# Altium PCB DRIVER.PcbDoc (part 3 of 5)
Units mm, origin at the board's own origin, x right, y up, seen from the top; angles counter-clockwise.
Board outline 130 x 51 mm, 4 copper layers (SIG, GND_SIG, PWR, GND_PWR), stack 1.544 mm thick; 199 components, 147 nets, 682 pads, 359 vias.
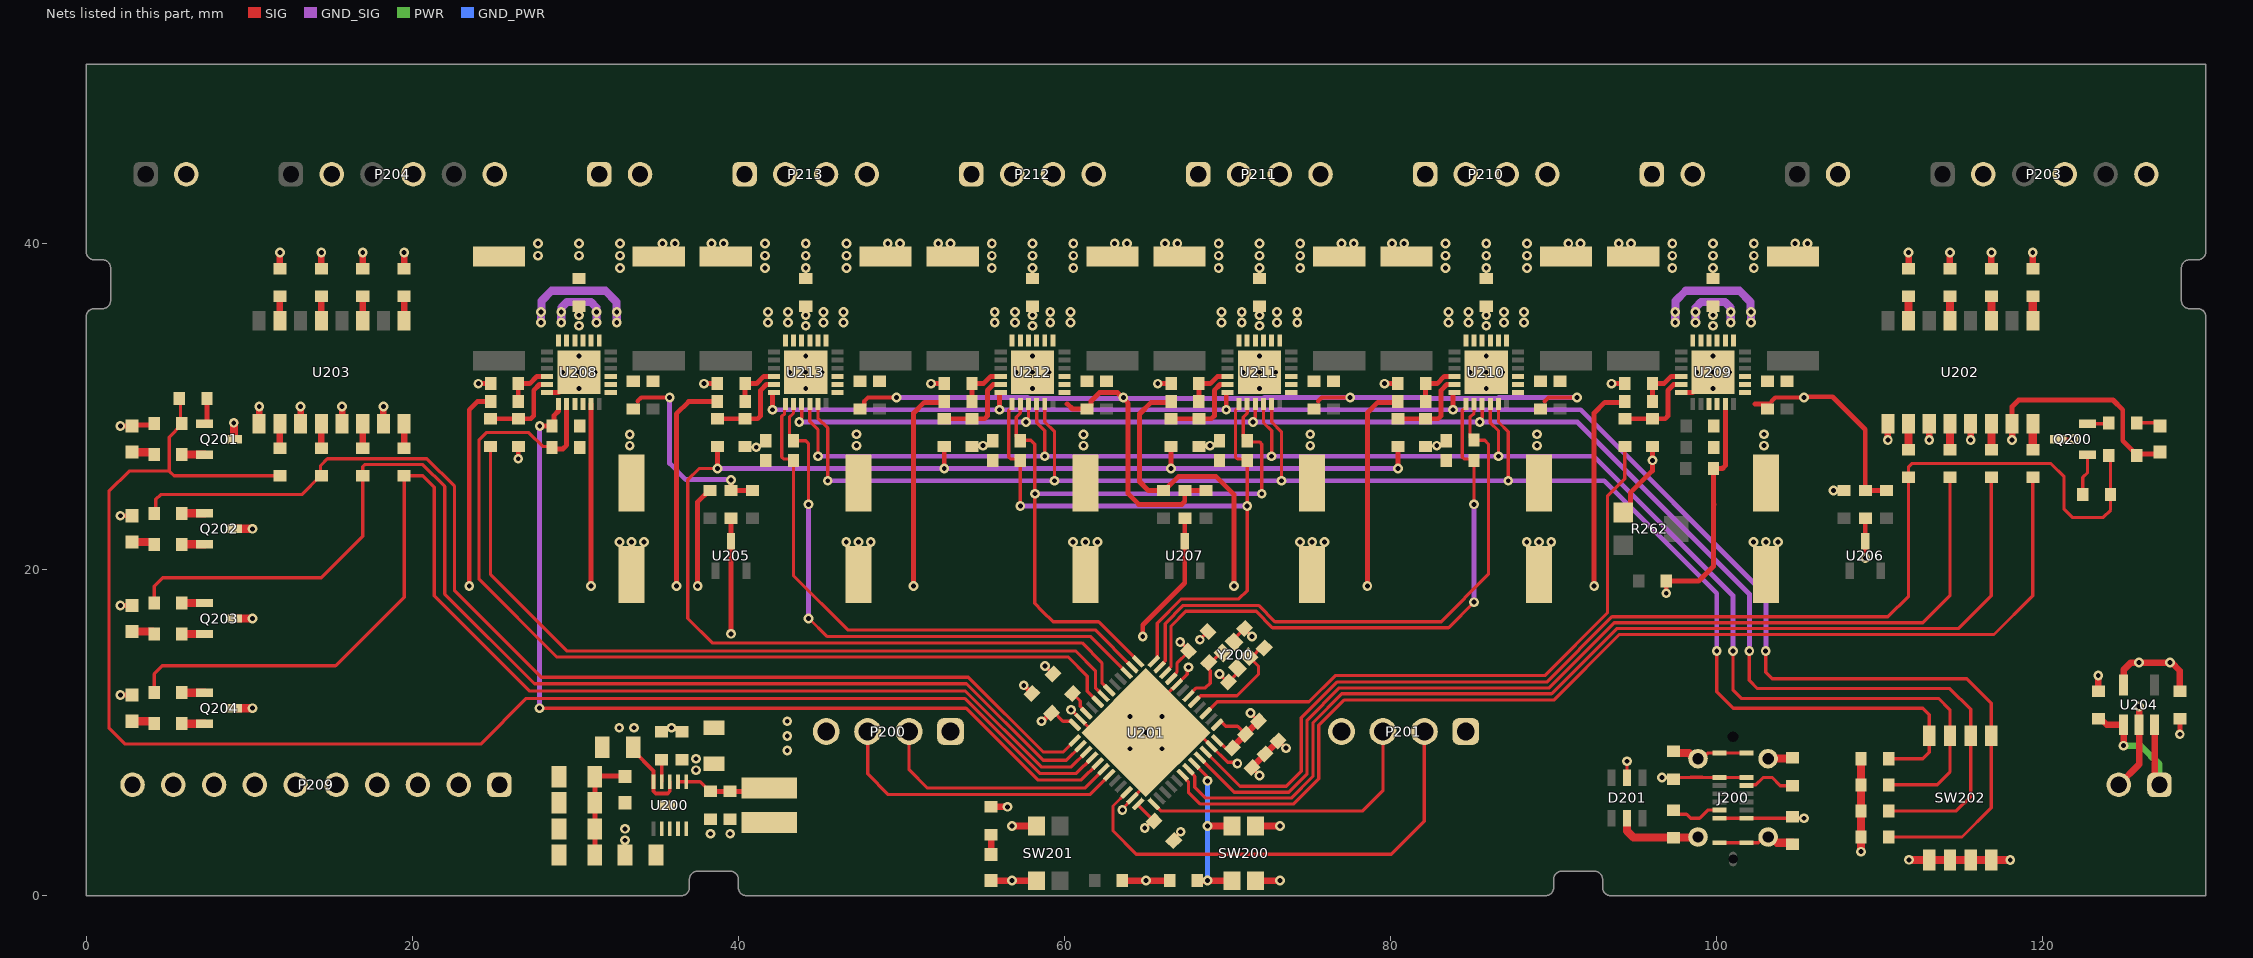
[diagram p4: the nets of this part, all layers, seen from the top]

## Part data (continued)
R249 R252: library part RC0603FR-0718K2L, "RES 18.2K OHM 1% 1/10W 0603", Case Code (Imperial)=0603, Case Code (Metric)=1608, Manufacturer="Yageo Group", Max Operating Temperature=155°C, Max Power Dissipation=100mW, Min Operating Temperature=-55°C, Supplier Part Number=311-18.2KHRCT-ND, Temperature Coefficient=±200ppm/°C, Tolerance=1%, Voltage Rating=75V, Voltage Rating (AC)=50V, Case/Package=0603, Category="Chip SMD Resistors", China RoHS=Non-Compliant, Component Link Description=https://www.yageogroup.com/content/datasheet/asset/file/PYU-RC_GROUP_51_ROHS_L, Component Link URL=https://www.yageogroup.com/content/datasheet/asset/file/PYU-RC_GROUP_51_ROHS_L, Composition="Thick Film", Contact Plating=Tin, Datasheet=https://www.yageogroup.com/content/datasheet/asset/file/PYU-RC_GROUP_51_ROHS_L, Depth=800µm, Features="Moisture Resistant", Height=450µm, Lead Free="Lead Free", Length=1.6mm, Lifecycle Status=Production, Manufacturer Part Number=RC0603FR-0718K2L, Military Standard=Not, Mounting Technology="Surface Mount", Number of Terminals=2, Number of Terminations=2, Packaging="Tape & Reel", Power Dissipation=100mW, Power Rating=100mW, Radiation Hardening=No, REACH SVHC=Yes, RoHS=Compliant, Supplier=DigiKey, Termination=SMD/SMT, Voltage Rating (DC)=50V, Weight=2.012816mg, Width=800µm, Working Voltage=75V
R250 R251 R253 R254 R277 R278 R280 R281 R291 R292 R294 R295: library part RL2512FK-070R2L, "RES 0.2 OHM 1% 1W 2512", Case Code (Imperial)=2512, Case Code (Metric)=6332, Manufacturer="Yageo Group", Max Operating Temperature=155°C, Min Operating Temperature=-55°C, Power Rating=1W, Ratings=AEC-Q200, Supplier Part Number=311-0.2TCT-ND, Temperature Coefficient=600ppm/°C, Tolerance=1%, Working Voltage=447.2mV, Case/Package=2512, Category="Chip SMD Resistors", China RoHS=Non-Compliant, ComponentLink1Description=https://datasheet.octopart.com:443/RL2512FK-070R2L-Yageo-datasheet-182189623.pdf?src-supplier=IHS, ComponentLink1URL=https://datasheet.octopart.com:443/RL2512FK-070R2L-Yageo-datasheet-182189623.pdf?src-supplier=IHS, ComponentLink2Description=https://datasheet.octopart.com:443/RL2512FK-070R2L-Yageo-datasheet-83209227.pdf?src-supplier=LCSC, ComponentLink2URL=https://datasheet.octopart.com:443/RL2512FK-070R2L-Yageo-datasheet-83209227.pdf?src-supplier=LCSC, ComponentLink3Description=https://datasheet.octopart.com:443/RL2512FK-070R2L-Yageo-Group-datasheet-178203169.pdf?src-supplier=Future+Electronics, ComponentLink3URL=https://datasheet.octopart.com:443/RL2512FK-070R2L-Yageo-Group-datasheet-178203169.pdf?src-supplier=Future+Electronics, ComponentLink4Description=https://datasheet.octopart.com:443/RL2512FK-070R2L-Yageo-datasheet-137700928.pdf?src-supplier=Future+Electronics, ComponentLink4URL=https://datasheet.octopart.com:443/RL2512FK-070R2L-Yageo-datasheet-137700928.pdf?src-supplier=Future+Electronics, ComponentLink5Description=https://datasheet.octopart.com:443/RL2512FK-070R2L-Yageo-datasheet-42224166.pdf?src-supplier=Future+Electronics, ComponentLink5URL=https://datasheet.octopart.com:443/RL2512FK-070R2L-Yageo-datasheet-42224166.pdf?src-supplier=Future+Electronics, ComponentLink6Description=https://datasheet.octopart.com:443/RL2512FK-070R2L-Yageo-datasheet-21255488.pdf?src-supplier=Future+Electronics, ComponentLink6URL=https://datasheet.octopart.com:443/RL2512FK-070R2L-Yageo-datasheet-21255488.pdf?src-supplier=Future+Electronics, ComponentLink7Description=https://datasheet.octopart.com:443/RL2512FK-070R2L-Yageo-datasheet-12526708.pdf?src-supplier=Future+Electronics, ComponentLink7URL=https://datasheet.octopart.com:443/RL2512FK-070R2L-Yageo-datasheet-12526708.pdf?src-supplier=Future+Electronics, ComponentLink8Description=https://datasheet.octopart.com:443/RL2512FK-070R2L-Yageo-datasheet-12521612.pdf?src-supplier=Future+Electronics, ComponentLink8URL=https://datasheet.octopart.com:443/RL2512FK-070R2L-Yageo-datasheet-12521612.pdf?src-supplier=Future+Electronics, ComponentLink9Description=https://datasheet.octopart.com/RL2512FK-070R2L-Yageo-datasheet-10916029.pdf, ComponentLink9URL=https://datasheet.octopart.com/RL2512FK-070R2L-Yageo-datasheet-10916029.pdf, ComponentLink10Description=http://sigma.octopart.com:80/conflict_mineral_statement/Yageo-company-3.pdf?src-supplier=Compliance+Statements, ComponentLink10URL=http://sigma.octopart.com:80/conflict_mineral_statement/Yageo-company-3.pdf?src-supplier=Compliance+Statements, ComponentLink11Description=http://sigma.octopart.com:80/rohs_statement/Yageo-company-2.pdf?src-supplier=Compliance+Statements, ComponentLink11URL=http://sigma.octopart.com:80/rohs_statement/Yageo-company-2.pdf?src-supplier=Compliance+Statements, Composition="Thick Film", Contact Plating="Lead, Tin", Country of Origin="Mainland China, Taiwan", Depth=3.2mm, Export Control Classification Number (ECCN) Code=EAR99, Harmonized Tariff Schedule (HTS) Code=8533.21.00.30, Height=550µm, Introduction Date=2005-04-15, Lead Free="Lead Free", Length=6.35mm, Lifecycle Status=Production, Manufacturer Part Number=RL2512FK-070R2L, Military Standard=Not, Mounting Technology="Surface Mount", Number of Terminals=2, Pricing="1=0.44, 10=0.249, 25=0.206, 50=0.1814, 100=0.1618, 250=0.142, 500=0.13056, 1000=0.12148 (USD)", REACH SVHC=Yes, RoHS=Compliant, Schedule B="8533210045, 8533210045|8533210045, 8533210045|8533210045|8533210045, 8533210045|8533210045|8533210045|8533210045", Stock=22890, Supplier=DigiKey, Termination=SMD/SMT, Weight=40.511469mg, Width=3.2mm
R257 R258 R259 R260 R272 R273 R274 R275 R286 R287 R288 R289: library part RC0603FR-0747K5L, "RES 47.5K OHM 1% 1/10W 0603", Case Code (Imperial)=0603, Case Code (Metric)=1608, Manufacturer="Yageo Group", Max Operating Temperature=155°C, Max Power Dissipation=100mW, Min Operating Temperature=-55°C, Supplier Part Number=311-47.5KHRCT-ND, Temperature Coefficient=±200ppm/°C, Tolerance=1%, Voltage Rating=75V, Voltage Rating (AC)=50V, Case/Package=0603, Category="Chip SMD Resistors", China RoHS=Non-Compliant, Component Link Description=https://www.yageogroup.com/content/datasheet/asset/file/PYU-RC_GROUP_51_ROHS_L, Component Link URL=https://www.yageogroup.com/content/datasheet/asset/file/PYU-RC_GROUP_51_ROHS_L, Composition="Thick Film", Contact Plating=Tin, Datasheet=https://www.yageogroup.com/content/datasheet/asset/file/PYU-RC_GROUP_51_ROHS_L, Depth=800µm, Features="Moisture Resistant", Height=450µm, Lead Free="Lead Free", Length=1.6mm, Lifecycle Status=Production, Manufacturer Part Number=RC0603FR-0747K5L, Military Standard=Not, Mounting Technology="Surface Mount", Number of Terminals=2, Number of Terminations=2, Packaging="Tape & Reel", Power Dissipation=100mW, Power Rating=100mW, Radiation Hardening=No, REACH SVHC=Yes, RoHS=Compliant, Supplier=DigiKey, Termination=SMD/SMT, Voltage Rating (DC)=50V, Weight=2.012816mg, Width=800µm, Working Voltage=75V
R261 R268 R269 R282 R283: library part RC0603FR-071KL, "RES 1K OHM 1% 1/10W 0603", Case Code (Imperial)=0603, Case Code (Metric)=1608, Manufacturer="Yageo Group", Max Operating Temperature=155°C, Max Power Dissipation=100mW, Min Operating Temperature=-55°C, Supplier Part Number=311-1.00KHRCT-ND, Temperature Coefficient=±200ppm/°C, Tolerance=1%, Voltage Rating=75V, Voltage Rating (AC)=50V, Case/Package=0603, Category="Chip SMD Resistors", China RoHS=Non-Compliant, Component Link Description=https://www.yageogroup.com/content/datasheet/asset/file/PYU-RC_GROUP_51_ROHS_L, Component Link URL=https://www.yageogroup.com/content/datasheet/asset/file/PYU-RC_GROUP_51_ROHS_L, Composition="Thick Film", Contact Plating=Tin, Datasheet=https://www.yageogroup.com/content/datasheet/asset/file/PYU-RC_GROUP_51_ROHS_L, Depth=800µm, Features="Moisture Resistant", Height=450µm, Lead Free="Lead Free", Length=1.6mm, Lifecycle Status=Production, Manufacturer Part Number=RC0603FR-071KL, Military Standard=Not, Mounting Technology="Surface Mount", Number of Terminals=2, Number of Terminations=2, Packaging="Tape & Reel", Power Dissipation=100mW, Power Rating=100mW, Radiation Hardening=No, REACH SVHC=Yes, RoHS=Compliant, Supplier=DigiKey, Termination=SMD/SMT, Voltage Rating (DC)=50V, Weight=2.012816mg, Width=800µm, Working Voltage=75V
R262: library part TC33X-2-103E, "TRIMMER 10K OHM 0.15W J LEAD TOP", Color=Silver, Manufacturer=Bourns, Max Operating Temperature=100°C, Max Power Dissipation=100mW, Min Operating Temperature=-40°C, Power Dissipation=150mW, Supplier Part Number=TC33X-103ECT-ND, Temperature Coefficient=250ppm/°C, Tolerance=25%, Voltage Rating (DC)=50V, Category="Variable Resistors and Potentiometers", ComponentLink1Description=https://datasheet.octopart.com:443/TC33X-2-103E-Bourns-datasheet-182142024.pdf?src-supplier=IHS, ComponentLink1URL=https://datasheet.octopart.com:443/TC33X-2-103E-Bourns-datasheet-182142024.pdf?src-supplier=IHS, ComponentLink2Description=https://datasheet.octopart.com:443/TC33X-2-103E-Bourns-datasheet-134530277.pdf?src-supplier=Upverter, ComponentLink2URL=https://datasheet.octopart.com:443/TC33X-2-103E-Bourns-datasheet-134530277.pdf?src-supplier=Upverter, ComponentLink3Description=https://datasheet.octopart.com:443/TC33X-2-103E-Bourns-datasheet-11551316.pdf?src-supplier=element14+APAC, ComponentLink3URL=https://datasheet.octopart.com:443/TC33X-2-103E-Bourns-datasheet-11551316.pdf?src-supplier=element14+APAC, ComponentLink4Description=https://datasheet.octopart.com:443/TC33X-2-103E-Bourns-datasheet-65566108.pdf?src-supplier=element14+APAC, ComponentLink4URL=https://datasheet.octopart.com:443/TC33X-2-103E-Bourns-datasheet-65566108.pdf?src-supplier=element14+APAC, ComponentLink5Description=https://datasheet.octopart.com:443/TC33X-2-103E-Bourns-datasheet-67039831.pdf?src-supplier=Farnell, ComponentLink5URL=https://datasheet.octopart.com:443/TC33X-2-103E-Bourns-datasheet-67039831.pdf?src-supplier=Farnell, ComponentLink6Description=https://datasheet.octopart.com:443/TC33X-2-103E-Bourns-datasheet-164917123.pdf?src-supplier=Farnell, ComponentLink6URL=https://datasheet.octopart.com:443/TC33X-2-103E-Bourns-datasheet-164917123.pdf?src-supplier=Farnell, ComponentLink7Description=https://datasheet.octopart.com:443/TC33X-2-103E-Bourns-datasheet-38800.pdf?src-supplier=Farnell, ComponentLink7URL=https://datasheet.octopart.com:443/TC33X-2-103E-Bourns-datasheet-38800.pdf?src-supplier=Farnell, ComponentLink8Description=https://datasheet.octopart.com:443/TC33X-2-103E-Bourns-datasheet-26822215.pdf?src-supplier=Newark, ComponentLink8URL=https://datasheet.octopart.com:443/TC33X-2-103E-Bourns-datasheet-26822215.pdf?src-supplier=Newark, ComponentLink9Description=https://datasheet.octopart.com:443/TC33X-2-103E-Bourns-datasheet-41964919.pdf?src-supplier=Newark, ComponentLink9URL=https://datasheet.octopart.com:443/TC33X-2-103E-Bourns-datasheet-41964919.pdf?src-supplier=Newark, ComponentLink10Description=https://datasheet.octopart.com:443/TC33X-2-103E-Bourns-datasheet-154730028.pdf?src-supplier=Electro+Sonic, ComponentLink10URL=https://datasheet.octopart.com:443/TC33X-2-103E-Bourns-datasheet-154730028.pdf?src-supplier=Electro+Sonic, ComponentLink11Description=https://datasheet.octopart.com:443/TC33X-2-103E-Bourns-datasheet-47549324.pdf?src-supplier=RS+(Formerly+Allied+Electronics), ComponentLink11URL=https://datasheet.octopart.com:443/TC33X-2-103E-Bourns-datasheet-47549324.pdf?src-supplier=RS+(Formerly+Allied+Electronics), ComponentLink12Description=https://datasheet.octopart.com:443/TC33X-2-103E-Bourns-datasheet-549861.pdf?src-supplier=RS+(Formerly+Allied+Electronics), ComponentLink12URL=https://datasheet.octopart.com:443/TC33X-2-103E-Bourns-datasheet-549861.pdf?src-supplier=RS+(Formerly+Allied+Electronics), ComponentLink13Description=https://datasheet.octopart.com:443/TC33X-2-103E-Bourns-datasheet-5319878.pdf?src-supplier=element14, ComponentLink13URL=https://datasheet.octopart.com:443/TC33X-2-103E-Bourns-datasheet-5319878.pdf?src-supplier=element14, ComponentLink14Description=https://datasheet.octopart.com:443/TC33X-2-103E-Bourns-datasheet-177040515.pdf?src-supplier=Burklin+Elektronik, ComponentLink14URL=https://datasheet.octopart.com:443/TC33X-2-103E-Bourns-datasheet-177040515.pdf?src-supplier=Burklin+Elektronik, ComponentLink15Description=https://datasheet.octopart.com:443/TC33X-2-103E-Bourns-datasheet-39003.pdf?src-supplier=Mouser, ComponentLink15URL=https://datasheet.octopart.com:443/TC33X-2-103E-Bourns-datasheet-39003.pdf?src-supplier=Mouser, ComponentLink16Description=http://sigma.octopart.com:80/conflict_mineral_statement/Bourns-company-36.pdf?src-supplier=Compliance+Statements, ComponentLink16URL=http://sigma.octopart.com:80/conflict_mineral_statement/Bourns-company-36.pdf?src-supplier=Compliance+Statements, Composition="Cermet, Potentiometer", Contact Plating="Copper, Silver, Tin", Depth=3.8mm, Height=1.2mm, Lead Free="Lead Free", Length=3mm, Lifecycle Status=Production, Manufacturer Part Number=TC33X-2-103E, Military Standard=Not, Mounting Technology="Surface Mount", Number of Terminals=3, Number of Turns=1, Packaging="Cut Tape", Power Rating=100mW, Pricing="1=0.25, 10=0.213, 25=0.1996, 50=0.1896, 100=0.18, 250=0.168, 500=0.15938, 1000=0.15119 (USD)", Radiation Hardening=No, REACH SVHC=Yes, RoHS=Compliant, Schedule B="8533400080, 8533400080|8533400080|8533400080|8533400080|8533400080", Stock=18061, Supplier=DigiKey, Taper=Linear, Termination="Foot Print", Weight=29.4mg, Width=3.6mm, Working Voltage=50V
R264 R265 R266 R267: library part RC0805FR-078K87L, "RES 8.87K OHM 1% 1/8W 0805", Case Code (Imperial)=0805, Manufacturer="Yageo Group", Max Operating Temperature=155°C, Max Power Dissipation=125mW, Min Operating Temperature=-55°C, Supplier Part Number=311-8.87KCRCT-ND, Temperature Coefficient=100ppm/°C, Tolerance=1%, Voltage Rating=150V, Case/Package=0805, Category="Chip SMD Resistors", China RoHS=Non-Compliant, ComponentLink1Description=https://datasheet.octopart.com:443/RC0805FR-078K87L-Yageo-datasheet-175887523.pdf?src-supplier=Newark, ComponentLink1URL=https://datasheet.octopart.com:443/RC0805FR-078K87L-Yageo-datasheet-175887523.pdf?src-supplier=Newark, ComponentLink2Description=https://datasheet.octopart.com:443/RC0805FR-078K87L-Yageo-datasheet-103092701.pdf?src-supplier=Upverter, ComponentLink2URL=https://datasheet.octopart.com:443/RC0805FR-078K87L-Yageo-datasheet-103092701.pdf?src-supplier=Upverter, ComponentLink3Description=https://datasheet.octopart.com:443/RC0805FR-078K87L-Yageo-Group-datasheet-176638170.pdf?src-supplier=Future+Electronics, ComponentLink3URL=https://datasheet.octopart.com:443/RC0805FR-078K87L-Yageo-Group-datasheet-176638170.pdf?src-supplier=Future+Electronics, ComponentLink4Description=https://datasheet.octopart.com:443/RC0805FR-078K87L-Yageo-datasheet-164759695.pdf?src-supplier=Future+Electronics, ComponentLink4URL=https://datasheet.octopart.com:443/RC0805FR-078K87L-Yageo-datasheet-164759695.pdf?src-supplier=Future+Electronics, ComponentLink5Description=https://datasheet.octopart.com:443/RC0805FR-078K87L-Yageo-datasheet-12592811.pdf?src-supplier=Future+Electronics, ComponentLink5URL=https://datasheet.octopart.com:443/RC0805FR-078K87L-Yageo-datasheet-12592811.pdf?src-supplier=Future+Electronics, ComponentLink6Description=https://datasheet.octopart.com:443/RC0805FR-078K87L-Yageo-datasheet-8330313.pdf?src-supplier=Future+Electronics, ComponentLink6URL=https://datasheet.octopart.com:443/RC0805FR-078K87L-Yageo-datasheet-8330313.pdf?src-supplier=Future+Electronics, ComponentLink7Description=https://datasheet.octopart.com:443/RC0805FR-078K87L-Yageo-datasheet-8324252.pdf?src-supplier=Future+Electronics, ComponentLink7URL=https://datasheet.octopart.com:443/RC0805FR-078K87L-Yageo-datasheet-8324252.pdf?src-supplier=Future+Electronics, ComponentLink8Description=https://datasheet.octopart.com/RC0805FR-078K87L-Yageo-datasheet-73766026.pdf, ComponentLink8URL=https://datasheet.octopart.com/RC0805FR-078K87L-Yageo-datasheet-73766026.pdf, ComponentLink9Description=https://datasheet.octopart.com:443/RC0805FR-078K87L-Yageo-datasheet-118657.pdf?src-supplier=DigiKey, ComponentLink9URL=https://datasheet.octopart.com:443/RC0805FR-078K87L-Yageo-datasheet-118657.pdf?src-supplier=DigiKey, ComponentLink10Description=http://sigma.octopart.com:80/conflict_mineral_statement/Yageo-company-3.pdf?src-supplier=Compliance+Statements, ComponentLink10URL=http://sigma.octopart.com:80/conflict_mineral_statement/Yageo-company-3.pdf?src-supplier=Compliance+Statements, ComponentLink11Description=http://sigma.octopart.com:80/rohs_statement/Yageo-company-2.pdf?src-supplier=Compliance+Statements, ComponentLink11URL=http://sigma.octopart.com:80/rohs_statement/Yageo-company-2.pdf?src-supplier=Compliance+Statements, Composition="Thick Film", Contact Plating="Lead, Tin", Depth=1.25mm, Features="Moisture Resistant", Height=500µm, Lead Free="Lead Free", Length=2mm, Lifecycle Status=Production, Manufacturer Part Number=RC0805FR-078K87L, Military Standard=Not, Mounting Technology="Surface Mount", Number of Terminals=2, Number of Terminations=2, Power Dissipation=125mW, Power Rating=125mW, Pricing="1=0.1, 10=0.008, 25=0.0072 (USD)", Radiation Hardening=No, REACH SVHC=Yes, RoHS=Compliant, Schedule B="8533210045, 8533210045|8533210045|8533210045|8533210045|8533210045", Stock=98675, Supplier=DigiKey, Termination=SMD/SMT, Voltage Rating (DC)=150V, Width=1.25mm, Working Voltage=150V
R276 R279 R290 R293: library part RC0603FR-0722K1L, "RES 22.1K OHM 1% 1/10W 0603", Case Code (Imperial)=0603, Case Code (Metric)=1608, Manufacturer="Yageo Group", Max Operating Temperature=155°C, Max Power Dissipation=100mW, Min Operating Temperature=-55°C, Supplier Part Number=311-22.1KHRCT-ND, Temperature Coefficient=±200ppm/°C, Tolerance=1%, Voltage Rating=75V, Voltage Rating (AC)=50V, Case/Package=0603, Category="Chip SMD Resistors", China RoHS=Non-Compliant, Component Link Description=https://www.yageogroup.com/content/datasheet/asset/file/PYU-RC_GROUP_51_ROHS_L, Component Link URL=https://www.yageogroup.com/content/datasheet/asset/file/PYU-RC_GROUP_51_ROHS_L, Composition="Thick Film", Contact Plating=Tin, Datasheet=https://www.yageogroup.com/content/datasheet/asset/file/PYU-RC_GROUP_51_ROHS_L, Depth=800µm, Features="Moisture Resistant", Height=450µm, Lead Free="Lead Free", Length=1.6mm, Lifecycle Status=Production, Manufacturer Part Number=RC0603FR-0722K1L, Military Standard=Not, Mounting Technology="Surface Mount", Number of Terminals=2, Number of Terminations=2, Packaging="Tape & Reel", Power Dissipation=100mW, Power Rating=100mW, Radiation Hardening=No, REACH SVHC=Yes, RoHS=Compliant, Supplier=DigiKey, Termination=SMD/SMT, Voltage Rating (DC)=50V, Weight=2.012816mg, Width=800µm, Working Voltage=75V
SW200 SW201: "WS-TASV J-Bend SMT Tact Switch, 3.5mm x 2.9mm x 1.7mm, SPST-NO, 350gf, 12V, 50mA", Manufacturer="Wurth Elektronik", Operating Temperature Max=85degC, Operating Temperature Min=-40degC, Rated Current=50mA, Rated Voltage (DC)=12V, Category="Tact Switch", Circuit=SPST-NO, ComponentLink1Description="Website Link", ComponentLink1URL=https://www.we-online.com, ComponentLink2Description="Datasheet Link", ComponentLink2URL=https://www.we-online.com/components/products/datasheet/434153017835, Contact Material="Stainless Steel", Contact Plating=Silver, Height=1.7mm, Length=3.5mm, Manufacturer Part Number=434153017835, Match Code=WS-TASV, Mount="Surface Mount", Operation Force=350gf, Packaging="Tape and Reel", Terminal Material="Copper Alloy", Terminal Plating=Silver, Washable=No, Width=2.9mm
SW202: "WS-DISV Small Compact SMD Dip Switch, Flat Actuator with Top Tape, pitch 1.27mm, 4p", Manufacturer="Wurth Elektronik", Operating Temperature Max=85degC, Operating Temperature Min=-40degC, Rated Current Non-Switching=100mA, Rated Current Switching=25mA, Rated Voltage Non-Switching=50VDC, Rated Voltage Switching=24VDC, Actuator Type="Flat Type", Category="Dip Switches", ComponentLink1Description="Website Link", ComponentLink1URL=https://www.we-online.com/redexpert/article/416131160804?ad, ComponentLink2Description="Datasheet Link", ComponentLink2URL=https://www.we-online.com/redexpert/spec/416131160804?ad, Contact Material="Copper Alloy", Contact Plating=Gold, Manufacturer Part Number=416131160804, Match Code=WS-DISV, Mount="Surface Mount", Number of Poles=4, Operation Force=500g, Packaging="Tape and Reel", Pitch=1.27mm
U200: "IC REG BUCK 3.3V 300MA 10DFN", Manufacturer=STMicroelectronics, Max Operating Temperature=150°C, Max Output current=300mA, Max Output Voltage=60V, Max Switching Frequency=2.42MHz, Min Input Voltage=3.5V, Min Operating Temperature=-40°C, Min Output Voltage=850mV, Nominal Output Voltage=3.3V, Nominal Supply Voltage=24V, Quiescent Current=10µA, Supplier Part Number=497-L7983PU33RCT-ND, Category="Voltage Regulators - Switching", China RoHS=Compliant, Country of Origin="Mainland China", Export Control Classification Number (ECCN) Code=EAR99, Harmonized Tariff Schedule (HTS) Code=8542.39.00.60, Height - Seated (Max)=800µm, Introduction Date=2020-10-06, Length=3mm, Lifecycle Status=Production, Manufacturer Part Number=L7983PU33R, Max Supply Voltage=60V, Number of Circuits=1, Number of Terminals=10, Output Current=300mA, Packaging="Tape and Reel", Pricing="1=2.69, 10=2.001, 25=1.83, 100=1.6411, 250=1.55108, 500=1.5155 (USD)", REACH SVHC=Yes, RoHS=Compliant, Schedule B="8542390000, 8542390000|8542390000|8542390000|8542390000|8542390000|8542390000|8542390000|8542390000|8542390000|8542390000|8542390000|8542390000|8542390000|8542390000|8542390000|8542390000|8542390000|8542390000|8542390000|8542390000|8542390000|8542390000|8542390000|85", Stock=4366, Supplier=DigiKey, Synchronous Rectifier=Yes, Terminal Pitch=500µm, Topology=Buck, Width=3mm
U201: "IC MCU 32BIT 512KB FLSH 48UFQFPN", Case/Package=UFQFPN, Clock Frequency=26MHz, Frequency=100MHz, Manufacturer=STMicroelectronics, Max Operating Temperature=85°C, Max Power Dissipation=625mW, Max Supply Current=34.5mA, Max Supply Voltage=3.6V, Min Operating Temperature=-40°C, Min Supply Voltage=1.7V, Nominal Supply Current=1.8µA, Operating Supply Voltage=3.3V, Supplier Part Number=497-14907-ND, ADC Channels (Resolution)="10-Ch 12-Bit", Category=Microcontrollers, China RoHS=Compliant, ComponentLink1Description=https://datasheet.octopart.com:443/STM32F411CEU6-STMicroelectronics-datasheet-41919523.pdf?src-supplier=element14+APAC, ComponentLink1URL=https://datasheet.octopart.com:443/STM32F411CEU6-STMicroelectronics-datasheet-41919523.pdf?src-supplier=element14+APAC, ComponentLink2Description=https://datasheet.octopart.com:443/STM32F411CEU6-STMicroelectronics-datasheet-27102711.pdf?src-supplier=Upverter, ComponentLink2URL=https://datasheet.octopart.com:443/STM32F411CEU6-STMicroelectronics-datasheet-27102711.pdf?src-supplier=Upverter, ComponentLink3Description=https://datasheet.octopart.com:443/STM32F411CEU6-STMicroelectronics-datasheet-114750309.pdf?src-supplier=Newark, ComponentLink3URL=https://datasheet.octopart.com:443/STM32F411CEU6-STMicroelectronics-datasheet-114750309.pdf?src-supplier=Newark, ComponentLink4Description=https://datasheet.octopart.com:443/STM32F411CEU6-STMicroelectronics-datasheet-34219326.pdf?src-supplier=Newark, ComponentLink4URL=https://datasheet.octopart.com:443/STM32F411CEU6-STMicroelectronics-datasheet-34219326.pdf?src-supplier=Newark, ComponentLink5Description=https://datasheet.octopart.com:443/STM32F411CEU6-STMicroelectronics-datasheet-82511007.pdf?src-supplier=SHENGYU+ELECTRONICS, ComponentLink5URL=https://datasheet.octopart.com:443/STM32F411CEU6-STMicroelectronics-datasheet-82511007.pdf?src-supplier=SHENGYU+ELECTRONICS, Core Architecture="ARM Cortex-M4", Data Bus Width=32b, EEPROM Memory Size=0B, Flash Memory Size=512kB, Height - Seated (Max)=600µm, Interface="SDIO, USB", Lead Free="Lead Free", Length=7mm, Lifecycle Status=Production, Manufacturer Part Number=STM32F411CEU6, Memory Format=FLASH, Memory Size=512kB, Mounting Technology="Surface Mount", Number of A/D Converters=1, Number of ADC Channels=16, Number of Channels=10, Number of I2C Channels=3, Number of I/Os=36, Number of Interrupts=16, Number of Programmable I/O=36, Number of SPI Channels=5, Number of Terminals=48, Number of Timers/Counters=2, Number of USART Channels=3, Oscillator Type=Internal, Packaging="Cut Tape", Peripherals=POR, Pins=48, Pricing="1=6.18, 10=4.745, 25=4.386, 100=3.991, 260=3.79569, 520=3.68344, 1040=3.59105, 2600=3.49353 (USD)", Radiation Hardening=No, RAM Size=128kB, REACH SVHC=Yes, RoHS=Compliant, Schedule B="8542310000, 8542310000|8542310000|8542310000|8542310000|8542310000|8542310000|8542310000|8542310000|8542310000|8542310000|8542310000|8542310000|8542310000|8542310000|8542310000|8542310000|8542310000|8542310000|8542310000|8542310000|8542310000|8542310000|8542310000|85", Stock=3816, Supplier=DigiKey, Terminal Pitch=500µm, Watchdog Timer=Yes, Width=7mm
U202 U203: "OPTOISO 3.75KV 4CH TRANS 16-SO", Case/Package=SOIC, Collector Emitter Breakdown Voltage=80V, Collector Emitter Saturation Voltage=300mV, Current Transfer Ratio=50%, Dark Current=80nA, Forward Current=50mA, Forward Voltage=1.4V, Isolation Voltage=3.75kV, Manufacturer=Toshiba, Manufacturer Part Number=TLP293-4(TP,E, Max Junction Temperature (Tj)=125°C, Max Power Dissipation=100mW, Min Operating Temperature=-55°C, Supplier Part Number=TLP293-4(TPECT-ND, Category=Optocouplers, Collector Emitter Voltage (VCEO)=300mV, ComponentLink1Description=https://datasheet.octopart.com:443/TLP293-4%28TP%2CE-Toshiba-datasheet-165584699.pdf?src-supplier=IHS, ComponentLink1URL=https://datasheet.octopart.com:443/TLP293-4%28TP%2CE-Toshiba-datasheet-165584699.pdf?src-supplier=IHS, ComponentLink2Description=https://datasheet.octopart.com:443/TLP293-4%28TP%2CE-Toshiba-datasheet-62096132.pdf?src-supplier=Upverter, ComponentLink2URL=https://datasheet.octopart.com:443/TLP293-4%28TP%2CE-Toshiba-datasheet-62096132.pdf?src-supplier=Upverter, Height=2.3mm, Lifecycle Status=Production, Max Operating Temperature=125°C, Max Output Voltage=80V, Mounting Technology="Surface Mount", Number of Channels=4, Number of Elements=4, Output Current per Channel=50mA, Packaging="Tape & Reel (TR)", Pins=16, Pricing="1=1.54, 10=1.093, 100=0.8233, 500=0.704, 1000=0.66505 (USD)", REACH SVHC=Yes, RoHS=Compliant, Schedule B="8541408000, 8541408000|8541408000|8541408000|8541408000|8541408000", Stock=42408, Supplier=DigiKey, Turn-Off Delay Time=3µs, Turn-On Delay Time=3µs
U204: "IC REG LINEAR 3.3V 200MA SOT23-5", Case/Package=LSSOP, Dropout Voltage=200mV, Manufacturer=STMicroelectronics, Max Junction Temperature (Tj)=125°C, Max Output current=200mA, Max Power Dissipation=500mW, Max Supply Voltage=13.2V, Min Input Voltage=4.3V, Min Operating Temperature=-40°C, Nominal Output Voltage=3.3V, Quiescent Current=60µA, Supplier Part Number=497-14824-1-ND, Voltage Tolerance=3%, Accuracy=2%, Category="LDO Voltage Regulators", China RoHS=Compliant, ComponentLink1Description=https://datasheet.octopart.com:443/LDK220M33R-STMicroelectronics-datasheet-164563982.pdf?src-supplier=IHS, ComponentLink1URL=https://datasheet.octopart.com:443/LDK220M33R-STMicroelectronics-datasheet-164563982.pdf?src-supplier=IHS, ComponentLink2Description=https://datasheet.octopart.com:443/LDK220M33R-STMicroelectronics-datasheet-44506895.pdf?src-supplier=element14+APAC, ComponentLink2URL=https://datasheet.octopart.com:443/LDK220M33R-STMicroelectronics-datasheet-44506895.pdf?src-supplier=element14+APAC, ComponentLink3Description=https://datasheet.octopart.com:443/LDK220M33R-STMicroelectronics-datasheet-24910216.pdf?src-supplier=Future+Electronics, ComponentLink3URL=https://datasheet.octopart.com:443/LDK220M33R-STMicroelectronics-datasheet-24910216.pdf?src-supplier=Future+Electronics, ComponentLink4Description=https://datasheet.octopart.com:443/LDK220M33R-STMicroelectronics-datasheet-36991664.pdf?src-supplier=Newark, ComponentLink4URL=https://datasheet.octopart.com:443/LDK220M33R-STMicroelectronics-datasheet-36991664.pdf?src-supplier=Newark, ComponentLink5Description=https://datasheet.octopart.com:443/LDK220M33R-STMicroelectronics-datasheet-101746762.pdf?src-supplier=Augswan, ComponentLink5URL=https://datasheet.octopart.com:443/LDK220M33R-STMicroelectronics-datasheet-101746762.pdf?src-supplier=Augswan, Contact Plating=Tin, Country of Origin="Mainland China", Export Control Classification Number (ECCN) Code=EAR99, Harmonized Tariff Schedule (HTS) Code=8542.39.00.60, Height=1mm, Height - Seated (Max)=1.45mm, Introduction Date=2014-03-19, Lead Free="Lead Free", Length=2.95mm, Lifecycle Status=Production, Manufacturer Part Number=LDK220M33R, Max Operating Temperature=125°C, Mounting Technology="Surface Mount", Number of Channels=1, Number of Circuits=1, Number of Outputs=1, Number of Regulators=1, Number of Terminals=5, Output Current=200mA, Output Type=Fixed, Output Voltage=3.3V, Packaging="Cut Tape", Pins=5, Polarity=Positive, Pricing="1=0.39, 10=0.268, 25=0.2388, 100=0.2061, 250=0.1906, 500=0.18124, 1000=0.17353 (USD)", Radiation Hardening=No, REACH SVHC=Yes, RoHS=Compliant, Schedule B="8542390000, 8542390000|8542390000|8542390000|8542390000|8542390000", Stock=13215, Supplier=DigiKey, Terminal Pitch=950µm, Weight=29.993795mg, Width=1.6mm
U205 U206 U207: "IC VREF SHUNT ADJ 0.25% SOT23-3", Case/Package=SOT-23, Cathode Current=400µA, Manufacturer=STMicroelectronics, Max Operating Temperature=125°C, Max Output current=100mA, Max Output Voltage=1.243V, Max Supply Voltage=25V, Min Operating Temperature=-40°C, Min Output Voltage=1.237V, Min Supply Voltage=1.24V, Output Voltage=24V, Supplier Part Number=497-4637-1-ND, Temperature Coefficient=100ppm/°C, Tolerance=0.25%, Category="Voltage References", China RoHS=Compliant, ComponentLink1Description=https://datasheet.octopart.com:443/TS3431CILT-STMicroelectronics-datasheet-12523092.pdf?src-supplier=SHENGYU+ELECTRONICS, ComponentLink1URL=https://datasheet.octopart.com:443/TS3431CILT-STMicroelectronics-datasheet-12523092.pdf?src-supplier=SHENGYU+ELECTRONICS, ComponentLink2Description=https://datasheet.octopart.com:443/TS3431CILT-STMicroelectronics-datasheet-10408717.pdf?src-supplier=Upverter, ComponentLink2URL=https://datasheet.octopart.com:443/TS3431CILT-STMicroelectronics-datasheet-10408717.pdf?src-supplier=Upverter, ComponentLink3Description=https://datasheet.octopart.com:443/TS3431CILT-STMicroelectronics-datasheet-124172.pdf?src-supplier=Farnell, ComponentLink3URL=https://datasheet.octopart.com:443/TS3431CILT-STMicroelectronics-datasheet-124172.pdf?src-supplier=Farnell, ComponentLink4Description=https://datasheet.octopart.com:443/TS3431CILT-STMicroelectronics-datasheet-140368796.pdf?src-supplier=TME, ComponentLink4URL=https://datasheet.octopart.com:443/TS3431CILT-STMicroelectronics-datasheet-140368796.pdf?src-supplier=TME, ComponentLink5Description=https://datasheet.octopart.com:443/TS3431CILT-STMicroelectronics-datasheet-18487.pdf?src-supplier=DigiKey, ComponentLink5URL=https://datasheet.octopart.com:443/TS3431CILT-STMicroelectronics-datasheet-18487.pdf?src-supplier=DigiKey, Height=1.02mm, Height - Seated (Max)=1.12mm, Lead Free="Lead Free", Length=2.9mm, Lifecycle Status=Production, Manufacturer Part Number=TS3431CILT, Mounting Technology="Surface Mount", Nominal Output Voltage=1.24V, Nominal Supply Current=400µA, Nominal Supply Voltage=1.24V, Number of Channels=1, Number of Circuits=1, Number of Outputs=1, Number of Terminals=3, Output Current=100mA, Packaging="Tape and Reel", Pins=3, Pricing="1=0.62, 10=0.44, 25=0.3944, 100=0.3441, 250=0.32016, 500=0.30574, 1000=0.29386 (USD)", Radiation Hardening=No, REACH SVHC=Yes, Reference Type="Adjustable, Shunt", Reference Voltage=1.24V, RoHS=Compliant, Schedule B="8542390000, 8542390000|8542390000|8542390000|8542390000|8542390000", Stock=16066, Supplier=DigiKey, Terminal Pitch=950µm, Termination=SMD/SMT, Width=1.3mm
U208 U209: "IC MOTOR DRIVER 7V-45V 24TQFPN", Drain to Source Resistance=500mΩ, Manufacturer=STMicroelectronics, Max Operating Temperature=150°C, Max Output current=1.5A, Max Supply Voltage=45V, Min Operating Temperature=-40°C, Min Supply Voltage=7V, Operating Supply Voltage=36V, Output Voltage=48V, Supplier Part Number=497-18119-1-ND, Category="Motor Drivers", China RoHS=Compliant, ComponentLink1Description=https://datasheet.octopart.com:443/STSPIN840-STMicroelectronics-datasheet-116891059.pdf?src-supplier=ODG+(Origin+Data+Global), ComponentLink1URL=https://datasheet.octopart.com:443/STSPIN840-STMicroelectronics-datasheet-116891059.pdf?src-supplier=ODG+(Origin+Data+Global), Height - Seated (Max)=1.1mm, Interface=Parallel, Length=4mm, Lifecycle Status=Production, Manufacturer Part Number=STSPIN840, Number of Circuits=1, Number of Terminals=24, Output Current=1.5A, Pricing="1=2.95, 10=2.208, 25=2.022, 100=1.8174, 250=1.71984, 500=1.66102, 1000=1.61261 (USD)", REACH SVHC=Yes, RoHS=Compliant, Schedule B="8542390000, 8542390000|8542390000|8542390000|8542390000|8542390000", Stock=9342, Supplier=DigiKey, Terminal Pitch=500µm, Width=4mm
U210 U211 U212 U213: "IC MTR DRVR BIPLR 7-45V 24TFQFPN", Manufacturer=STMicroelectronics, Supplier Part Number=497-17713-1-ND, Category="Motor Drives", ComponentLink1Description=https://datasheet.ciiva.com:443/pdfs/VipMasterIC/IC/SGST/SGST-S-A0005002811/SGST-S-A0005002811-1.pdf?src-supplier=IHS+Markit, ComponentLink1URL=https://datasheet.ciiva.com:443/pdfs/VipMasterIC/IC/SGST/SGST-S-A0005002811/SGST-S-A0005002811-1.pdf?src-supplier=IHS+Markit, ComponentLink2Description=http://www.farnell.com/datasheets/2549178.pdf?src-supplier=Farnell, ComponentLink2URL=http://www.farnell.com/datasheets/2549178.pdf?src-supplier=Farnell, ComponentLink3Description=http://www.st.com/content/ccc/resource/technical/document/datasheet/group3/64/0a/8b/fb/e5/29/46/34/DM00436631/files/DM00436631.pdf/jcr:content/translations/en.DM00436631.pdf?src-supplier=Digikey, ComponentLink3URL=http://www.st.com/content/ccc/resource/technical/document/datasheet/group3/64/0a/8b/fb/e5/29/46/34/DM00436631/files/DM00436631.pdf/jcr:content/translations/en.DM00436631.pdf?src-supplier=Digikey, ComponentLink4Description=https://datasheet.octopart.com/STSPIN820-STMicroelectronics-datasheet-99887157.pdf?src-supplier=Newark, ComponentLink4URL=https://datasheet.octopart.com/STSPIN820-STMicroelectronics-datasheet-99887157.pdf?src-supplier=Newark, ComponentLink5Description=http://www.farnell.com/datasheets/2549178.pdf?src-supplier=Newark, ComponentLink5URL=http://www.farnell.com/datasheets/2549178.pdf?src-supplier=Newark, ComponentLink6Description=https://datasheet.octopart.com/STSPIN820-STMicroelectronics-datasheet-163660309.pdf?src-supplier=SHENGYU+ELECTRONICS, ComponentLink6URL=https://datasheet.octopart.com/STSPIN820-STMicroelectronics-datasheet-163660309.pdf?src-supplier=SHENGYU+ELECTRONICS, Manufacturer Part Number=STSPIN820, Pricing="1=3.03, 10=2.271, 25=2.0804, 100=1.8709, 250=1.77096, 500=1.71068, 1000=1.66108 (USD)", Reach SVHC Compliant=Yes, RoHS=Yes, RoHS Compliant=Yes, Stock=11767, Supplier=Digikey, Throw Configuration="STEPPER MOTOR CONTROLLER"
Y200: library part 830069494, "WE-XTAL Quartz Crystal, IQXC-42, 25MHz, +/-15ppm", Case/Size Code=IQXC-42, Frequency Stability=20ppm, Frequency Tolerance=+/-15ppm, Load Capacitance=10pF, Manufacturer="Wurth Elektronik", Operating Temperature Max=85degC, Operating Temperature Min=-40degC, Application="Processor, USB, 3G/4G/5G, Ethernet, Small Cell, PHY, PCI Express", Category=Crystals, ComponentLink1Description="Website Link", ComponentLink1URL=https://www.we-online.com/redexpert/article/830069494?ad, ComponentLink2Description="Datasheet Link", ComponentLink2URL=https://www.we-online.com/redexpert/spec/830069494?ad, Frequency=25MHz, Height=0.5mm, Length=2mm, Manufacturer Part Number=830069494, Match Code=WE-XTAL, Mount="Surface Mount", Packaging="Tape and Reel", Width=1.6mm

## Via types
v1: diameter 0.6, hole 0.3, SIG to GND_PWR, tented both sides, 324 vias
v2: diameter 0.6, hole 0.3, SIG to GND_PWR, 35 vias

## Nets (pads, with @x,y where several pads share a name; then routed paths per layer and width w, separated by ;. In a path a pad name is that pad's centre, name@x,y a point inside that pad or via, vN(x,y) a via of type N, cw(c..) or ccw(c..) an arc to the next point about the centre after c; other vN are vias at no path point)
+3V3: C201.2 C202.2 C204.2 L200.2 Q200.3 Q201.3 Q202.3 Q203.3 Q204.3 R200.1 R234.2 R241.2 R244.2 R249.2 R252.2 R261.1 R263.1 R268.2 R269.2 R282.2 R283.2 SW202.5 SW202.6 SW202.7 SW202.8 U200.1 U200.2 U208.23 U209.23 | length 133.7
  SIG w0.2: U200.2@36.3,6.996 U200.1@36.8,6.996 37.652,6.996 38.25,6.398 C202.2@38.3,6.398 ; Q200.3@120.942,28 v1@121.8,28
  SIG w0.3: v1(23.5,19) 23.5,26.6 ; 23.5,25.5 23.5,26.6 ; R249.2@24.806,30.3 24,30.3 23.5,29.8 23.5,26.6 ; v1(30.972,19) U208.23@30.972,30.15 ; v1(36.2,19) 36.2,29.55 36.95,30.3 R283.2@38.717,30.3 ; v1(37.506,19) 37.506,24.15 38.206,24.85 R234.2@38.256,24.85 ; C202.2@38.3,6.398 C201.2@39.5,6.398 41.7,6.398 L200.2@41.9,6.598 ; v1(50.75,19) 50.75,29.6 51.4,30.25 R282.2@52.578,30.25 ; R269.2@66.489,30.25 65.311,30.25 64.6,29.539 64.6,25.4 65.15,24.85 R244.2@66.078,24.85 66.128,24.85 66.978,25.7 69.3,25.7 70.402,24.598 v1(70.402,19) ; v1(78.572,19) 78.572,29.6 79.222,30.25 R268.2@80.4,30.25 ; v1(92.483,19) 92.483,29.6 93.133,30.25 R252.2@94.311,30.25 ; v1(96.906,18.55) R261.1@96.906,19.3 98.9,19.3 99.8,20.2 99.8,24 ; 99.827,24 99.8,24.027 R263.1@99.8,26.2 100.351,26.2 100.527,26.376 U209.23@100.527,30.15 ; v1(107.161,24.85) R241.2@107.811,24.85
  SIG w0.5: Q204.3@9.057,11.5 v1(10.2,11.5) ; Q203.3@9.057,17 v1(10.2,17) ; Q202.3@9.057,22.5 v1(10.2,22.5) ; Q201.3@9.057,28 9.077,28 9.081,28.004 9.081,28.981 v1@9.1,29 ; v1@111.8,2.19 SW202.5@113.033,2.19 SW202.6@114.303,2.19 SW202.7@115.573,2.19 SW202.8@116.843,2.19 v1(118,2.19)
  other v1: 111.8,2.2 37.4,7.7 37.4,8.4 121.9,28 9.057,29
+3V3_ISO: C218.2 R206.1 R210.1 R212.1 R218.1 R220.1 R225.1 R227.1 R232.1 U204.5 | length 14
  SIG w0.4: R232.1@11.887,38.45 v1(11.887,39.45) ; R227.1@14.427,38.45 v1(14.427,39.45) ; R225.1@16.967,38.45 v1(16.967,39.45) ; R220.1@19.507,38.45 v1(19.507,39.45) ; R218.1@111.763,38.45 v1(111.763,39.45) ; R212.1@114.303,38.45 v1(114.303,39.45) ; R210.1@116.843,38.45 v1(116.843,39.45) ; R206.1@119.383,38.45 v1(119.383,39.45) ; U204.5@124.947,12.919 124.947,13.847 125.4,14.3 v1(125.9,14.3) v1(127.8,14.3) 127.9,14.3 128.4,13.8 C218.2@128.4,12.55
+5V_ISO: C217.2 P206.1 U204.1 U204.3 | length 10.7
  SIG w0.4: C217.2@123.45,10.95 123.919,10.481 U204.1@124.947,10.481 v1(124.947,9.2) ; U204.3@126.852,10.481 126.852,7.098 P206.1@127.15,6.8
  PWR w0.4: v1(124.947,9.2) 126,9.2 127.15,8.05 P206.1@127.15,6.8
+24V_PSU: C200.2 C219.1 C220.1 C221.2 C223.2 C229.1 C230.1 C231.2 C233.2 C239.1 C240.1 C241.2 C243.2 P209.1 P209.2 P209.3 P209.4 P209.5 R264.2 R265.2 R266.2 R267.2 U200.7 U200.8 U208.9 U208.10 U209.9 U209.10 U210.9 U210.10 U211.9 U211.10 U212.9 U212.10 U213.9 U213.10
  other v1: 33.339,27.6 47.25,27.6 61.161,27.6 75.072,27.6 88.983,27.6 102.894,27.6 33.339,28.29 47.25,28.3 61.161,28.29 75.072,28.3 88.983,28.3 102.894,28.3 30.222,34.95 44.133,34.95 58.044,34.95 71.955,34.95 85.866,34.95 99.777,34.95 30.222,35.6 44.133,35.6 58.044,35.6 71.955,35.6 85.866,35.6 99.777,35.6
+VBUS: C210.2 C211.2 D201.5 J200.A4 J200.A9 J200.B4 J200.B9 | length 11.4
  SIG w0.2: D201.5@94.5,7.245 v1(94.5,8.245) ; v1(96.65,7.25) 98.376,7.25 98.386,7.26 99.112,7.26 99.122,7.25 J200.A4@101.83,7.25 ; J200.B4@100.17,4.75 J200.A9@101.83,4.75 104.65,4.75 v1(105.35,4.75)
+VDD_MCU: C203.2 C212.2 C213.2 C214.2 C215.2 C216.2 P200.1 P201.1 R200.2 R201.2 SW200.1 SW200.3 U201.1 U201.9 U201.24 U201.36 U201.48 | length 18.1
  SIG w0.2: C212.2@59.301,11.299 59.907,10.693 60.418,10.693 U201.24@60.63,10.481 ; U201.36@64.519,5.63 64.507,5.618 64.507,5.568 C213.2@65.499,4.576 ; v1(64.926,4.149) 65.403,4.626 C213.2@65.424,4.626 ; U201.9@66.541,13.309 66.541,13.359 66.895,13.712 66.895,14.242 67.599,14.946 C203.2@67.599,14.999 ; v1(67.095,15.564) 67.608,15.051 C203.2@67.608,15.008 ; U201.48@69.37,9.519 69.415,9.519 69.91,9.024 C214.2@70.264,9.024 ; U201.1@69.37,10.481 69.558,10.669 69.608,10.669 69.891,10.385 70.615,10.385 C215.2@71.099,9.901 ; v1(71.4,11.2) 71.85,10.75 C216.2@71.95,10.75
  SIG w0.3: v1(58.6,10.7) 58.651,10.7 59.25,11.299 C212.2@59.301,11.299
  SIG w0.4: R201.2@55.5,5.45 v1(56.5,5.45) ; C214.2@70.264,9.024 70.264,9.064 C216.2@71.95,10.75 ; SW200.3@71.725,0.925 v1(73.225,0.925) ; SW200.1@71.725,4.275 v1(73.225,4.275)
  other v1: 43,8.9 43,9.8 43,10.7
+VREF_SP: C222.2 R235.2 R236.1 U208.1 U208.2 | length 12.2
  SIG w0.27: 33.821,30.332 34.039,30.55 v1(35.789,30.55)
  SIG w0.3: v1(39.556,25.5) R236.1@39.556,24.85 R235.2@40.856,24.85
  GND_SIG w0.3: v1(35.789,30.55) 35.789,26.511 36.781,25.519 v1@39.537,25.519
+VREF_STPR: C232.2 C234.2 C242.2 C244.2 R245.2 R246.1 U210.1 U211.1 U212.1 U213.1 | length 64.7
  SIG w0.27: C244.2@47.467,29.85 47.517,29.85 47.732,30.065 47.732,30.332 47.95,30.55 v1(49.7,30.55) ; 75.554,30.332 75.772,30.55 v1(77.522,30.55) ; 89.465,30.332 89.683,30.55 v1(91.433,30.55)
  SIG w0.3: 60.158,30.15 60.193,30.15 60.493,29.85 61.428,29.85 61.628,30.05 61.628,30.328 62.15,30.85 63.25,30.85 63.9,30.2 63.9,24.65 64.55,24 67.202,24 67.378,24.176 R246.1@67.378,24.85 R245.2@68.678,24.85
  GND_SIG w0.3: v1(49.7,30.55) 57.731,30.55 57.791,30.49 72.208,30.49 72.268,30.55 v1(77.522,30.55) 81.86,30.55 81.92,30.49 86.577,30.49 86.637,30.55 v1(91.433,30.55)
  other v1: 63.611,30.55
+VREF_VAC: C224.2 R242.2 R243.1 U209.1 U209.2 | length 12.8
  SIG w0.27: 103.376,30.332 103.594,30.55 v1(105.344,30.55)
  SIG w0.3: U209.2@101.727,31.35 U209.2@101.952,31.35 ; 102.343,30.15 C224.2@103.194,30.15 ; v1@105.344,30.6 107.1,30.6 109.111,28.589 R243.1@109.111,24.85 R242.2@110.411,24.85
BOOT: R202.2 SW200.2 SW200.4 U201.44 | length 11.1
  SIG w0.2: U201.44@67.956,8.105 68.698,7.362 68.698,7.121 v1(68.775,7.044)
  SIG w0.4: R202.2@68.15,0.925 v1(68.775,0.925) SW200.4@70.275,0.925 ; v1(68.775,4.275) SW200.2@70.275,4.275
  GND_PWR w0.3: v1(68.775,0.925) v1(68.775,7.044)
DCA: R240.2 SW202.1 U210.18 U211.18 U212.18 U213.18 | length 103
  SIG w0.2: v1(103,15) 103,13.7 103.4,13.3 115.343,13.3 116.843,11.8 SW202.1@116.843,9.81 116.843,5.4 115.043,3.6 R240.2@110.55,3.6
  SIG w0.3: v1@42.1,29.65 42.142,29.692 v1@42.142,29.8 ; v1(42.1,29.8) 42.1,30.85 U213.18@42.142,30.85 ; v1(56.011,29.8) U212.18@56.011,30.85 ; U212.18@56.056,30.85 U212.18@56.094,30.85 ; v1(69.922,29.8) U211.18@69.922,30.85 ; U211.18@69.967,30.85 U211.18@70.005,30.85 ; v1(83.833,29.8) U210.18@83.833,30.85 ; U210.18@83.878,30.85 U210.18@83.916,30.85
  GND_SIG w0.3: v1(42.1,29.8) v1(56.011,29.8) v1(69.922,29.8) v1(83.833,29.8) 91.652,29.8 103.011,18.441 103.011,15.011 v1(103,15)
GND: C200.1 C201.1 C202.1 C203.1 C204.1 C205.1 C206.1 C207.1 C208.1 C209.1 C210.1 C211.1 C212.1 C213.1 C214.1 C215.1 C216.1 C219.2 C220.2 C221.1 C222.1 C223.1 C224.1 C225.1 C226.1 C227.1 C228.1 C229.2 C230.2 C231.1 C232.1 C233.1 C234.1 C235.1 C236.1 C237.1 C238.1 C239.2 C240.2 C241.1 C242.1 C243.1 C244.1 C245.1 C246.1 C247.1 C248.1 D200.1 D201.2 D202.2 D203.2 D204.2 D205.2 D206.2 D207.2 J200.A1 J200.A12 J200.B1 J200.B12 J200.Shell P200.4 P201.4 P209.6 P209.7 P209.8 P209.9 P209.10 R202.1 R203.2 R204.1 R205.1 R214.1 R215.1 R236.2 R237.1 R238.1 R239.1 R240.1 R243.2 R246.2 R250.1 R251.1 R253.1 R254.1 R255.1 R256.1 R257.1 R258.1 R259.1 R260.1 R262.1 R272.1 R273.1 R274.1 R275.1 R276.1 R277.1 R278.1 R279.1 R280.1 R281.1 R286.1 R287.1 R288.1 R289.1 R290.1 R291.1 R292.1 R293.1 R294.1 R295.1 SW201.1 SW201.3 U200.10 U200.11 U201.8 U201.23 U201.35 U201.47 U201.49 U202.9 U202.11 U202.13 U202.15 U203.9 U203.11 U203.13 U203.15 U205.3 U206.3 U207.3 U208.3 U208.18 U208.21 U208.22 U208.25 U209.3 U209.18 U209.21 U209.22 U209.25 U210.2 U210.3 U210.25 U211.2 U211.3 U211.25 U212.2 U212.3 U212.25 U213.2 U213.3 U213.25 Y200.2 Y200.4 | length 120.1
  SIG w0.2: v1(58.8,14.08) 59.209,13.671 C209.1@59.229,13.671 ; v1(60.4,11.4) 60.409,11.4 60.975,10.834 U201.23@60.984,10.834 61.818,10 v2(65,10) ; v1(63.55,5.25) 63.55,5.319 64.166,5.934 U201.35@64.166,5.984 65,6.818 v2(65,10) ; C213.1@66.626,3.424 66.639,3.436 v1(67.125,3.923) ; v1(67.599,14.01) 67.522,13.933 67.522,13.583 U201.8@66.895,12.956 65,11.061 v2(65,10) ; v1(68.3,15.7) 68.735,16.135 C203.1@68.865,16.135 ; v1(69.5,13.6) 69.998,13.102 C206.1@70.05,13.102 70.614,13.666 Y200.2@70.614,13.966 ; Y200.4@70.402,15.564 70.402,15.749 C207.1@71.048,16.395 71.048,16.352 v1(71.5,15.9) ; v1(70.6,8.105) 70.523,8.181 70,8.181 U201.47@69.016,9.166 68.182,10 v2(65,10) ; C214.1@71.501,7.857 71.501,7.822 v1(71.96,7.364) ; C216.1@73.101,9.499 73.127,9.499 v1(73.578,9.048) ; J200.Shell@98.85,8.4 99.095,8.4 99.445,8.75 J200.B12@100.17,8.75 J200.A1@101.83,8.75 ; J200.B1@100.17,3.25 J200.A12@101.83,3.25 102.555,3.25 102.905,3.6 J200.Shell@103.15,3.6
  SIG w0.3: v1(2.1,12.3) D206.2@2.826,12.3 ; v1(2.1,17.8) 2.2,17.8 D205.2@2.826,17.8 ; v1(2.1,23.3) D204.2@2.826,23.3 ; v1(2.1,28.8) D203.2@2.826,28.8 2.9,28.875 4.101,28.875 R215.1@4.176,28.95 ; v1(24.056,31.4) C227.1@24.806,31.4 ; v1(26.506,26.8) C225.1@26.506,27.55 ; U208.18@28.272,30.85 28.972,30.85 v2(30.222,32.1) ; v1(37.9,31.4) C246.1@38.717,31.4 ; v1(39.556,16.06) R236.2@39.556,23.15 ; v1(51.811,31.4) C245.1@52.628,31.4 ; v1(57.5,12.9) 57.899,12.501 C212.1@58.099,12.501 ; v1(64.8,15.9) 64.8,16.6 67.378,19.178 U207.3@67.378,21.732 R246.2@67.378,23.15 ; v1(65.722,31.4) C236.1@66.539,31.4 ; v1(79.633,31.4) C235.1@80.45,31.4 ; v1(93.544,31.4) C228.1@94.361,31.4 ; R262.1@94.256,23.5 94.706,23.95 94.706,24.706 96.05,26.05 96.05,26.689 v1(96.061,26.7) C226.1@96.061,27.55 ; U209.18@97.827,30.85 98.527,30.85 v2(99.777,32.1) ; v1(109.111,20.71) U206.3@109.111,21.732 R243.2@109.111,23.15 ; U202.15@118.113,28.95 118.113,30 118.513,30.4 124.3,30.4 124.9,29.8 124.9,27.9 125.75,27.05 R214.1@125.75,27 125.85,27.1 127.074,27.1 D202.2@127.174,27.2
  SIG w0.4: U203.9@10.617,28.95 v1(10.617,30) ; U203.11@13.157,28.95 v1(13.157,30) ; U203.13@15.697,28.95 v1(15.697,30) ; U203.15@18.237,28.95 v1(18.237,30) ; D200.1@55.5,0.925 SW201.1@58.275,0.925 ; v1(56.775,4.275) SW201.3@58.275,4.275 ; C208.1@63.55,0.925 v1(65,0.925) R202.1@66.45,0.925 ; C214.1@71.501,7.857 71.501,7.878 73.101,9.478 C216.1@73.101,9.499 ; v1(110.493,27.95) U202.9@110.493,28.95 U202.9@110.493,29 ; v1(113.033,27.95) U202.11@113.033,28.95 U202.11@113.033,29 ; v1(115.573,27.95) U202.13@115.573,28.95 U202.13@115.573,29 ; v1(118.113,27.95) U202.15@118.113,28.95
  SIG w0.5: D201.2@94.5,4.755 94.504,4.751 94.504,3.971 94.9,3.575 98.825,3.575 J200.Shell@98.85,3.6 ; C210.1@97.35,8.75 98.311,8.75 98.661,8.4 J200.Shell@98.85,8.4 ; J200.Shell@103.15,3.6 103.339,3.6 103.689,3.25 C211.1@104.65,3.25 ; J200.Shell@103.15,8.4 103.175,8.425 104.625,8.425 R205.1@104.65,8.45 ; v1(108.85,2.7) R240.1@108.85,3.6 R239.1@108.85,5.2 R238.1@108.85,6.8 R237.1@108.85,8.4
  other v1: 56.775,0.925 33.05,3.4 38.3,3.8 39.5,3.8 33.05,4.1 32.7,10.3 33.6,10.3 35.9,10.3 32.706,21.7 33.456,21.7 34.206,21.7 46.617,21.7 47.367,21.7 48.117,21.7 60.528,21.7 61.278,21.7 62.028,21.7 74.439,21.7 75.189,21.7 75.939,21.7 88.35,21.7 89.1,21.7 89.85,21.7 102.261,21.7 103.011,21.7 103.761,21.7 41.1,27.5 55.011,27.6 68.922,27.6 82.833,27.6 32.74,38.5 41.635,38.5 44.133,38.5 46.633,38.5 55.544,38.5 58.044,38.5 60.544,38.5 69.455,38.5 71.955,38.5 74.455,38.5 83.366,38.5 85.866,38.5 88.366,38.5 97.277,38.5 99.777,38.5 102.277,38.5 27.722,39.25 30.222,39.25 32.74,39.25 41.635,39.25 44.133,39.25 46.633,39.25 55.544,39.25 58.044,39.25 60.544,39.25 69.455,39.25 71.955,39.25 74.455,39.25 83.366,39.25 85.866,39.25 88.366,39.25 97.277,39.25 99.777,39.25 102.277,39.25 27.722,40 30.222,40 32.74,40 35.355,40 36.105,40 38.35,40 39.1,40 41.635,40 44.133,40 46.633,40 49.166,40 49.916,40 52.261,40 53.011,40 55.544,40 58.044,40 60.544,40 63.077,40 63.827,40 66.172,40 66.922,40 69.455,40 71.955,40 74.455,40 76.988,40 77.738,40 80.083,40 80.833,40 83.366,40 85.866,40 88.366,40 90.899,40 91.649,40 93.994,40 94.744,40 97.277,40 99.777,40 102.277,40 104.81,40 105.56,40
  other v2: 64.01,9.01 65.99,9.01 64.01,10.99 65.99,10.99 30.222,31.1 44.133,31.1 58.044,31.1 71.955,31.1 85.866,31.1 99.777,31.1 29.222,32.1 31.222,32.1 43.133,32.1 44.133,32.1 45.133,32.1 57.044,32.1 58.044,32.1 59.044,32.1 70.955,32.1 71.955,32.1 72.955,32.1 84.866,32.1 85.866,32.1 86.866,32.1 98.777,32.1 100.777,32.1 30.222,33.1 44.133,33.1 58.044,33.1 71.955,33.1 85.866,33.1 99.777,33.1
GND_ISO: C217.1 C218.1 P202.2 P203.2 P203.4 P203.6 P204.2 P204.4 P204.6 P205.2 P206.2 U204.2 | length 7.1
  SIG w0.3: v1(128.4,9.9) C218.1@128.4,10.85
  SIG w0.4: C217.1@123.4,12.65 v1(123.4,13.5) ; P206.2@124.65,6.8 125.9,8.05 U204.2@125.9,10.481 v1(125.9,11.6)
MCU_CO_MIST: R248.2 U201.3 | length 37.8
  SIG w0.2: U201.3@68.663,11.188 69.37,11.895 74.995,11.895 76.6,13.5 89.464,13.5 93.3,17.336 93.3,24.5 94.361,25.561 R248.2@94.361,27.55
MCU_DIR_X: R272.2 U201.11 U210.20 | length 36.2
  SIG w0.2: U201.11@65.834,14.016 65.834,14.066 66.175,14.407 66.175,16.689 67.286,17.8 71.905,17.8 72.905,16.8 83.1,16.8 86,19.7 86,27.7 85.766,27.934 R272.2@85.116,27.934
  SIG w0.203: R272.2@85.116,27.9 84.868,28.148 84.868,28.316 84.866,28.317 84.866,29.35 85.116,29.6 U210.20@85.116,30.15
MCU_DIR_Y: R274.2 R286.2 U201.13 U211.20 U212.20 | length 42
  SIG w0.2: 58.65,17.45 59.3,16.8 62.089,16.8 U201.13@64.519,14.37